# Altium PCB EVT_SYS_CARRIER.PcbDoc (part 2 of 2)
Units mil, origin at the board's own origin, x right, y up, seen from the top; angles counter-clockwise.
Board outline 3543.31 x 2755.91 mil, 4 copper layers (Top Layer, Mid-Layer 1, Mid-Layer 2, Bottom Layer), stack 63.036 mil thick; 105 components, 66 nets, 607 pads, 200 vias.
Unrouted connection lines stored in the file: 138.
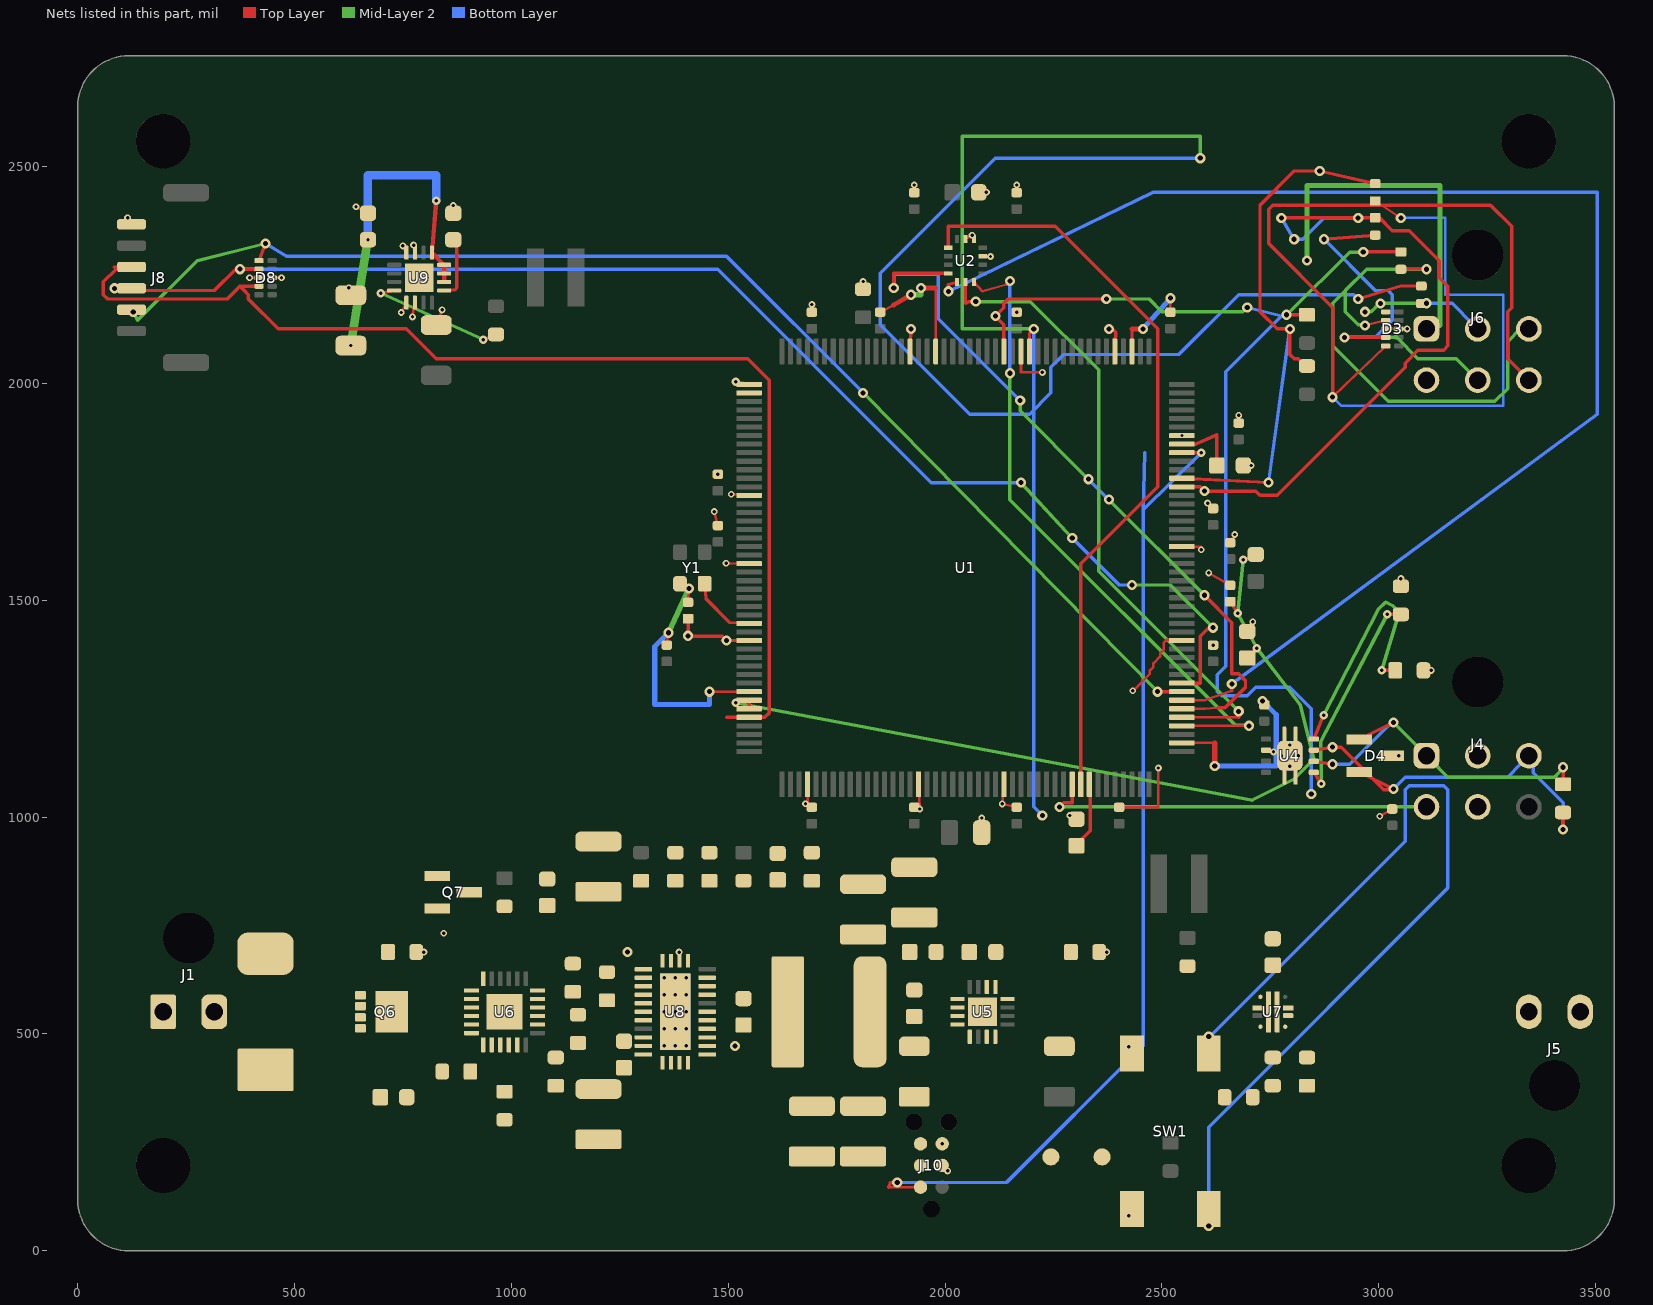
[diagram p4: the nets of this part, all layers, seen from the top]

## Via types
v1: diameter 23.62, hole 11.81, Top Layer to Bottom Layer, 90 vias
v2: diameter 15.75, hole 7.87, Top Layer to Bottom Layer, 89 vias
v3: diameter 19.68, hole 7.87, Top Layer to Bottom Layer, 18 vias
v4: diameter 15.75, hole 7.87, Top Layer to Mid-Layer 1, 2 vias
v5: diameter 11.81, hole 7.09, Top Layer to Mid-Layer 1, 1 vias

## Nets (pads, with @x,y where several pads share a name; then routed paths per layer and width w, separated by ;. In a path a pad name is that pad's centre, name@x,y a point inside that pad or via, vN(x,y) a via of type N, cw(c..) or ccw(c..) an arc to the next point about the centre after c; other vN are vias at no path point) (continued)
GND: C1.2 C2.2 C3.2 C4.2 C6D.2 C6I.2 C7D.2 C10.2 C11.2 C12.2 C13.2 C14.2 C15.2 C20.2 C21.2 C22.2 C40.2 C90.2 C91.2 C92.2 C93.2 C100.2 C101.2 C102.2 C103.2 C104.2 C105.2 C106.2 C107.2 C108.2 C109.2 C110.2 C111.2 C112.2 C113.2 C114.2 C115.2 C800.2 C801.2 C802.2 C803.2 C804.2 C806.2 C807.2 C808.2 C809.2 D1.2 D3.3 D3.8 D4.3 D8.3 D8.8 J1.2 J4.2 J4.5 J5.2 J6.1 J6.4 J8.6 J10.3 J10.5 R1.2 R2.2 R10.2 R41.2 R42.2 R63.2 R73.2 R801.2 R802.2 R805.2 SW1.2 U1.14 U1.22 U1.37 U1.48 U1.61 U1.71 U1.90 U1.102 U1.113 U1.126 U1.135 U1.148 U1.158 U2.6 U2.7 U2.9 U4.2 U4.9 U5.5 U5.6 U5.15 U5.16 U5.17 U6.8 U6.11 U6.25 U7.8 U8.13 U8.14 U8.15 U8.17 U8.19 U8.24 U8.25 U8.26 U8.27 U8.28 U8.29 U8.30 U8.31 U9.5 U9.6 U9.15 U9.16 U9.17 Y1.2 | length 4111
  Top Layer w5.91: v2(114.99,2382.37) J8.6@124.02,2367.13 ; v2(396.26,2244.09) D8.3@417.91,2244.09 ; D8.8@448.23,2244.09 v2(469.88,2244.09) ; v2(625.34,2220.85) C90.2@629.92,2203.74 ; v2(641.73,2407.48) C93.2@669.29,2392.72 ; v2(746.2,2163.75) U9.5@757.87,2186.52 ; v2(749.79,2317.44) U9.16@757.87,2301.67 ; v2(771.92,2153.53) U9.6@777.56,2186.52 ; v2(774.57,2319.14) U9.15@777.56,2301.67 ; R1.2@780.51,688.98 v2(798.23,688.98) ; U9.17@787.4,2244.09 v2(805.12,2244.09) ; C91.2@826.77,2134.84 v2(840.19,2169.76) ; C92.2@866.14,2392.72 v2(866.14,2410.43) ; C115.2@1407.48,1495.28 v1(1409.45,1527.56) ; v1(1456.69,1289.37) U1.37@1548.23,1289.37 ; v2(1467.72,1704.77) C101.2@1476.38,1672.44 ; v2(1495.09,1585.69) U1.22@1548.23,1584.65 ; v2(1506.97,1744.68) U1.14@1548.23,1742.13 ; U1.48@1683.07,1075.79 1683.07,1030.77 v2(1678.24,1030.77) C103.2@1692.91,1022.83 ; C15.2@1692.91,2164.57 v2(1692.91,2182.28) ; R10.2@1811.02,2217.52 v2(1811.02,2235.24) ; C113.2@1850.39,2164.57 1881.89,2181.1 ; C104.2@1929.13,1022.83 v2(1941.72,1018.77) U1.61@1938.98,1075.79 ; C20.2@1929.13,2440.16 v2(1929.13,2457.87) ; U1.158@1978.35,2073.82 1978.35,2220.47 ; J10.3@1993.5,196.85 v2(2006.03,184.32) ; U2.6@2047.24,2333.17 v2(2062.59,2342.03) U2.7@2066.93,2333.17 ; C21.2@2077.76,2440.94 v2(2095.47,2440.95) ; C12.2@2084.65,964.57 v2(2084.65,998.03) ; U2.9@2087.11,2293.31 v2(2104.82,2292.96) ; U1.71@2135.83,1075.79 v2(2131.93,1030.68) C105.2@2165.35,1022.83 ; C22.2@2165.35,2440.16 v2(2165.35,2457.87) ; U1.148@2175.2,2073.82 2175.2,2025.63 v4(2224.41,2025.63) ; v2(2287.81,1003.94) C10.2@2303.15,995.08 ; R2.2@2355.31,688.98 v2(2373.03,688.98) ; C106.2@2401.57,1022.83 2492.05,1022.84 v2(2492.05,1113.31) ; v2(2423.25,80.58) SW1.2@2431.1,96.46 ; v2(2423.25,470.6) SW1.2@2431.1,454.72 ; U1.135@2431.1,2073.82 2431.1,2125.98 ; v2(2433.07,1291.34) 2472.44,1330.71 2472.44,1338.58 2480.32,1346.46 2480.32,1354.33 2496.06,1370.08 2496.06,1377.95 2503.94,1385.83 2503.94,1401.57 2511.81,1409.45 2527.56,1409.45 U1.102@2546.26,1407.48 ; C111.2@2519.69,2164.57 v1(2519.68,2196.85) ; U1.90@2546.26,1171.26 2622.05,1171.26 ; U1.113@2546.26,1624.02 2590.93,1624.02 v2(2590.93,1616.65) ; v2(2605.58,1724.34) C109.2@2618.11,1711.81 ; v2(2608.04,1563.19) C13.2@2657.48,1534.65 ; C114.2@2657.48,1633.07 v2(2668.31,1651.82) ; C110.2@2677.17,1908.66 v2(2677.16,1926.38) ; C11.2@2687.99,1811.02 v2(2705.71,1811.02) ; C14.2@2696.85,1428.15 v2(2709.65,1450.31) ; U4.2@2740.16,1154.53 v2(2757.41,1150.52) ; v2(3002.51,1002.17) C40.2@3031.5,1018.9 ; D3.3@3016.34,2125.98 v2(3065.55,2125.98) D3.8@3046.65,2125.98 ; D4.3@3029.04,1141.73 v2(3046.75,1141.73) ; R42.2@3051.18,1532.48 v2(3051.18,1550.2) ; R41.2@3103.35,1338.58 v2(3121.06,1338.58) ; C102.2@1358.27,1396.85 v1(1362.2,1425.2) C102.2@1358.27,1396.85
  Top Layer w11.81: 1881.89,2181.1 v1(1921.26,2204.72) ; v1(1944.88,2220.47) 1978.35,2220.47 ; 2431.1,2125.98 v1(2456.69,2125.98) ; v1(2622.05,1118.11) 2622.05,1171.26
  Mid-Layer 2 w11.81: v1(1362.2,1425.2) v1(1409.45,1527.56) ; v1(1921.26,2204.72) 1944.88,2204.72 v1(1944.88,2220.47) ; v1(2834.65,2283.46) 2834.65,2456.69 3141.73,2456.69 3141.73,2133.86
  Bottom Layer w11.81: v1(1362.2,1425.2) 1330.71,1393.7 1330.71,1259.84 1456.69,1259.84 v1(1456.69,1289.37) ; v1(2456.69,2125.98) v1(2519.68,2196.85) ; v1(2622.05,1118.11) 2763.78,1118.11 2763.78,1236.22 v1(2732.28,1267.72)
  other v1: 1515.75,472.44 1267.72,688.98
  other v2: 1993.5,246.85 1386.81,688.98 843.98,732.28 2618.11,1396.85 1476.38,1790.55
  other v4: 2165.35,2164.57
  other v5: 2546.26,1879.92
GNSS_PPS: D8.4 J8.4 U1.40 | length 2730.4
  Top Layer w7.87: J8.4@124.02,2268.7 84.65,2268.7 88.58,2263.78 59.06,2234.25 59.06,2204.72 68.9,2194.88 344.49,2194.88 364.17,2214.57 374.02,2224.41 ; D8.4@417.91,2224.41 374.02,2224.41 ; U1.40@1548.23,1230.31 1496.06,1230.32 1505.91,1230.32 1584.65,1230.32 1594.49,1240.16 1594.49,2007.87 1545.28,2057.09 826.77,2057.09 757.87,2125.98 462.6,2125.98 393.7,2194.88 393.7,2204.72 383.86,2214.57 374.02,2224.41
GNSS_RX_EXT: D8.1 J8.2 U1.96 | length 2967.8
  Top Layer w7.87: J8.2@124.02,2170.28 v1(127.95,2165.35) ; D8.1@417.91,2283.46 v1(433.07,2322.83) ; v1(2490.16,1289.37) U1.96@2546.26,1289.37
  Mid-Layer 2 w7.87: v1(127.95,2165.35) 137.8,2145.67 275.59,2283.46 v1(433.07,2322.83) ; v1(1811.02,1978.35) v1(2490.16,1289.37)
  Bottom Layer w7.87: v1(433.07,2322.83) 482.28,2293.31 1496.06,2293.31 v1(1811.02,1978.35)
GNSS_TX_EXT: D8.2 J8.3 U1.97 | length 3171.7
  Top Layer w7.87: J8.3@124.02,2219.49 v1(84.65,2219.49) 98.43,2214.57 314.96,2214.57 364.17,2263.78 v1(374.02,2263.78) D8.2@417.91,2263.78 ; U1.97@2546.26,1309.06 2588.58,1309.06 2588.58,1417.32 2608.27,1437.01 v1(2618.11,1437.01)
  Mid-Layer 2 w7.87: v1(2175.2,1771.65) v1(2293.31,1643.7) ; v1(2431.1,1535.43) 2519.68,1535.43 2608.27,1446.85 v1(2618.11,1437.01)
  Bottom Layer w7.87: v1(374.02,2263.78) 383.86,2263.78 1476.38,2263.78 1968.5,1771.65 2165.35,1771.65 v1(2175.2,1771.65) ; v1(2293.31,1643.7) 2401.57,1535.43 v1(2431.1,1535.43)
HOST_UART1_RX: R600.2 R602.2 TP2.1 U1.150 | length 2558.4
  Top Layer w7.87: U1.150@2135.83,2073.82 2135.83,2086.61 2135.83,2135.83 v1(2116.14,2155.51) 2135.83,2175.2 2135.83,2185.04 2145.67,2194.88 v1(2372.05,2194.88) ; v1(2787.4,2158.46) R600.2@2834.65,2158.46 ; v1(2964.57,2303.54) R602.2@3051.18,2303.54
  Mid-Layer 2 w7.87: v1(2372.05,2194.88) 2470.47,2194.88 2500,2165.35 2687.01,2165.35 v1(2696.85,2175.2) ; v1(2787.4,2158.46) 2795.28,2165.35 2933.07,2303.15 2952.76,2303.15 v1(2964.57,2303.54)
  Bottom Layer w7.87: v1(2696.85,2175.2) 2775.59,2155.51 ; v1(2844.49,1053.15) 2844.49,1062.99 2844.49,1250 2795.28,1299.21 2716.54,1299.21 2696.85,1279.53 2637.8,1279.53 2627.95,1289.37 2627.95,1328.74 2647.64,1348.43 2647.64,2027.56 2775.59,2155.51 ; 2775.59,2155.51 v1(2787.4,2158.46) 2775.59,2155.51
HOST_UART1_RX_EXT: D3.2 J6.3 R602.1 | length 1403.1
  Top Layer w5.91: v1(2968.5,2133.86) D3.2@3016.34,2145.67 ; R602.1@3051.18,2263.39 v1(3110.24,2263.39)
  Mid-Layer 2 w7.87: v1(2968.5,2133.86) 2962.6,2135.83 2952.76,2135.83 2923.23,2165.35 2923.23,2214.57 2972.44,2263.78 ; J6.3@3336.61,2135.83 3326.77,2125.98 3297.24,2096.46 3297.24,1988.19 3267.72,1958.66 3021.65,1958.66 2893.7,2086.61 2893.7,2185.04 2972.44,2263.78 ; 2972.44,2263.78 v1@3100.39,2263.78 ; 2972.44,2263.78 v1@3100.39,2263.78 ; v1@3100.39,2263.78 v1(3110.24,2263.39) v1@3100.39,2263.78
HOST_UART1_TX: R601.2 TP1.1 U1.147 | length 4852.8
  Top Layer w7.87: U1.147@2194.88,2073.82 2194.88,2116.14 v1(2204.72,2125.98) ; v1(2952.76,2194.88) 3051.18,2224.8 R601.2@3098.43,2224.8
  Mid-Layer 2 w7.87: v1(2204.72,2125.98) 2039.37,2125.98 2039.37,2570.08 2588.58,2570.08 v1(2588.58,2519.68)
  Bottom Layer w7.87: v1(2204.72,2125.98) 2204.72,2116.14 2204.72,1023.62 2214.57,1013.78 v1(2224.41,1003.94) ; v1(2588.58,2519.68) 2116.14,2519.68 1850.39,2253.94 1850.39,2135.83 2057.09,1929.13 2194.88,1929.13 2244.09,1978.35 2244.09,2037.4 2273.62,2066.93 2539.37,2066.93 2677.17,2204.72 2942.91,2204.72 v1(2952.76,2194.88)
HOST_UART1_TX_EXT: D3.1 J6.2 R601.1 | length 289.6
  Top Layer w7.87: R601.1@3098.43,2184.65 v1(3110.24,2185.04)
  Mid-Layer 2 w7.87: v1(2968.5,2165.35) 2982.28,2165.35 2992.13,2175.2 v1(3003.94,2184.65) 3011.81,2185.04 v1(3110.24,2185.04)
  Bottom Layer w7.87: v1(3110.24,2185.04) 3169.29,2185.04 J6.2@3218.5,2135.83
HOST_UART2_RX: R604.2 R605.2 U1.121 | length 1299.4
  Top Layer w7.87: U1.121@2546.26,1781.5 v1(2746.06,1771.65) ; R605.2@2834.65,2040.35 2824.8,2047.24 2814.96,2057.09 2805.12,2057.09 2795.28,2066.93 2795.28,2116.14 v1(2795.28,2125.98) 2785.43,2125.98 2765.75,2125.98 2726.38,2165.35 2726.38,2411.42 2805.12,2490.16 2854.33,2490.16 v1(2864.17,2490.16) R604.2@2992.13,2461.02
  Bottom Layer w7.87: v1(2746.06,1771.65) v1(2795.28,2125.98)
HOST_UART2_RX_EXT: D3.5 J6.6 R604.1 | length 2770.7
  Top Layer w5.91: v1(2893.7,1968.5) D3.5@3016.34,2086.61 ; R604.1@2992.13,2420.87 v1(3051.18,2381.89)
  Top Layer w7.87: v1(2893.7,1968.5) 2893.7,1978.35 2893.7,2175.2 2746.06,2322.83 2746.06,2401.57 2755.91,2411.42 3257.87,2411.42 3307.09,2362.2 3307.09,2175.2 3297.24,2165.35 3297.24,2057.09 3336.61,2017.72 J6.6@3346.46,2007.87
  Bottom Layer w5.91: v1(2893.7,1968.5) 2913.39,1948.82 3153.54,1948.82 3287.4,1948.82 3287.4,2204.72 3153.54,2204.72 3153.54,2381.89 v1(3051.18,2381.89)
HOST_UART2_TX: R603.2 U1.120 | length 1644.5
  Top Layer w7.87: U1.120@2546.26,1761.81 2588.58,1761.81 v1(2598.43,1751.97) 2608.27,1751.97 2716.54,1751.97 2726.38,1742.13 2765.75,1742.13 3061.02,2037.4 3061.02,2047.24 3090.55,2076.77 3149.61,2076.77 3159.45,2086.61 3159.45,2224.41 3139.76,2244.09 3139.76,2283.46 3070.87,2352.36 3031.5,2352.36 3001.97,2381.89 2785.43,2381.89 v1(2775.59,2381.89) ; v1(2952.76,2381.89) R603.2@2992.13,2382.28
  Bottom Layer w7.87: v1(2775.59,2381.89) v1(2805.12,2332.68) 2814.96,2332.68 2824.8,2332.68 2874.02,2381.89 2942.91,2381.89 v1(2952.76,2381.89)
HOST_UART2_TX_EXT: D3.4 J6.5 R603.1 | length 943.6
  Top Layer w7.87: v1(2874.02,2332.68) R603.1@2992.13,2342.13 ; v1(2921.26,2106.3) D3.4@3016.34,2106.3
  Mid-Layer 2 w7.87: v1(2921.26,2106.3) 2933.07,2106.3 3041.34,2106.3 3090.55,2057.09 3179.13,2057.09 3208.66,2027.56 J6.5@3218.5,2017.72
  Bottom Layer w7.87: v1(2874.02,2332.68) 2992.13,2214.57 3021.65,2214.57 3031.5,2204.72 3031.5,2145.67 2992.13,2106.3 2933.07,2106.3 v1(2921.26,2106.3)
IMU_DRDY: U1.80 U2.4 | length 1752.9
  Top Layer w7.87: U2.4@2007.87,2312.99 2007.87,2362.2 2253.94,2362.2 2490.16,2125.98 2490.16,1761.81 2312.99,1584.65 U1.80@2312.99,1075.79
IMU_MISO: U1.94 U2.1 | length 1714.6
  Top Layer w5.91: U1.94@2546.26,1250 2598.43,1250 2629.92,1251.97
  Top Layer w7.87: v1(1881.89,2220.47) 1881.89,2253.94 U2.1@2007.38,2253.94 ; v1(2598.43,1511.81) 2661.42,1448.82 2661.42,1330.71 2677.17,1330.71 2692.91,1314.96 2692.91,1299.21 2645.67,1251.97 2629.92,1251.97
  Mid-Layer 2 w7.87: v1(2173.23,1960.63) 2173.23,1937.01 v1(2330.71,1779.53) ; v1(2377.95,1732.28) v1(2598.43,1511.81)
  Bottom Layer w7.87: v1(1881.89,2220.47) 1881.89,2251.97 1984.25,2251.97 1984.25,2181.1 1984.25,2149.61 v1(2173.23,1960.63) ; v1(2330.71,1779.53) v1(2377.95,1732.28)
IMU_MOSI: U1.95 U2.14 | length 3278.1
  Top Layer w5.91: U1.95@2546.26,1269.68 2598.43,1269.68 2661.42,1291.34
  Top Layer w7.87: v1(2007.87,2212.6) 2007.87,2228.35 U2.14@2027.56,2233.76 ; 2661.42,1291.34 v1(2661.42,1307.09)
  Bottom Layer w7.87: v1(2007.87,2212.6) 2480.32,2440.94 3307.09,2440.94 3503.94,2440.94 3503.94,1929.13 v1(2661.42,1307.09)
IMU_NSS: U1.92 U2.12 | length 1522.3
  Top Layer w5.91: U2.12@2066.93,2233.76 2086.61,2212.6 v1@2141.73,2228.35 ; U1.92@2546.26,1210.63 2598.43,1210.63 v1(2700.79,1210.63)
  Top Layer w7.87: v1@2141.73,2228.35 v1(2149.61,2236.22)
  Mid-Layer 2 w7.87: v1(2149.61,2023.62) 2149.61,1732.28 2669.29,1212.6 v1@2700.79,1212.6
  Bottom Layer w7.87: v1(2149.61,2023.62) v1(2149.61,2236.22)
IMU_SCK: U1.93 U2.13 | length 1487.8
  Top Layer w5.91: U1.93@2546.26,1230.31 2598.43,1230.32 2677.17,1230.32
  Top Layer w7.87: U2.13@2047.24,2233.76 2047.24,2185.04 2055.12,2188.98 v1(2070.87,2188.98) ; 2677.17,1230.32 v1(2677.17,1244.09)
  Mid-Layer 2 w7.87: v1(2070.87,2188.98) 2196.85,2188.98 2354.33,2031.5 2354.33,1566.93 v1(2677.17,1244.09)
MCU_HSE_25M: U1.29 Y1.3 | length 156.9
  Top Layer w7.87: Y1.3@1445.87,1538.39 1448.82,1503.94 1503.94,1448.82 U1.29@1548.23,1446.85
NRST: C115.1 SW1.1 U1.31 | length 2302
  Top Layer w7.87: C115.1@1407.48,1457.48 v1(1407.48,1418.11) 1417.32,1417.32 1486.22,1417.32 v1(1496.06,1407.48) ; v1@1486.22,1407.48 v1(1496.06,1407.48) ; U1.31@1548.23,1407.48 v1(1496.06,1407.48)
  Mid-Layer 2 w7.87: v1@2598.43,492.13 v1(2608.27,494.09)
  Bottom Layer w7.87: v1(2608.27,57.09) 2608.27,68.9 2608.27,285.43 3159.45,836.61 3159.45,1062.99 3149.61,1072.83 3070.87,1072.83 3061.02,1062.99 3061.02,944.88 2618.11,501.97 v1(2608.27,494.09)
RADAR_12V: J5.1 U7.6
RADAR_CANH: D4.1 J4.3 R40.1 U4.7 | length 899.8
  Top Layer w7.87: U4.7@2850.39,1154.53 v1(2893.7,1161.42) 2903.54,1161.42 2913.39,1161.42 3011.81,1062.99 3021.65,1062.99 v1(3033.96,1064.96) D4.1@2955.22,1104.33 ; v1(3425.2,971.46) R40.1@3425.2,1010.83
  Mid-Layer 2 w7.87: J4.3@3336.61,1131.89 J4.3@3346.46,1141.73
  Bottom Layer w7.87: v1(3033.96,1064.96) 3041.34,1072.83 3061.02,1092.52 3297.24,1092.52 3326.77,1122.05 J4.3@3336.61,1131.89 ; J4.3@3346.46,1141.73 3356.3,1131.89 3356.3,1122.05 3356.3,1102.36 3425.2,1033.46 3425.2,984.25 v1(3425.2,971.46)
RADAR_CANL: D4.2 J4.1 R40.2 U4.6 | length 804.5
  Top Layer w7.87: U4.6@2850.39,1128.94 v1(2893.7,1122.05) ; D4.2@2955.22,1179.13 v1(3033.96,1218.5) ; R40.2@3425.2,1075.79 v1(3425.2,1115.16)
  Mid-Layer 2 w7.87: v1(3033.96,1218.5) 3041.34,1210.63 3100.39,1151.57 J4.1@3110.24,1141.73 3120.08,1131.89 3159.45,1092.52 3405.51,1092.52 3415.35,1102.36 v1(3425.2,1115.16)
  Bottom Layer w7.87: v1(2893.7,1122.05) 2903.54,1122.05 2933.07,1122.05 3021.65,1210.63 v1(3033.96,1218.5)
RADAR_EFUSE_FLT: R7F.1 U1.2 U7.4
RADAR_REF: J4.4 U1.79 | length 922.4
  Top Layer w7.87: v1(2263.78,1023.62) 2273.62,1033.46 2293.31,1033.46 U1.79@2293.31,1075.79
  Mid-Layer 2 w7.87: v1(2263.78,1023.62) 3090.55,1023.62 3100.39,1023.62 J4.4@3100.39,1013.78
SHDN_PD: R42.1 U4.5 | length 491
  Top Layer w7.87: U4.5@2850.39,1103.35 v3(2867.87,1077.17) ; v3(3019.68,1467.52) R42.1@3051.18,1467.52
  Mid-Layer 2 w7.87: v3(2867.87,1077.17) 2866.14,1173.23 v3(3019.68,1467.52)
STB_PD: R41.1 U4.8 | length 569
  Top Layer w7.87: U4.8@2850.39,1180.12 v3(2872.99,1234.68) ; v3(3006.89,1338.58) R41.1@3038.39,1338.58
  Mid-Layer 2 w7.87: v3(2872.99,1234.68) 3000,1480.32 3015.75,1496.06 3031.5,1488.19 3047.24,1472.44 v3(3006.89,1338.58)
SWCLK: J10.4 U1.137 | length 63.3
  Top Layer w7.87: v1(2377.95,2125.98) 2385.83,2125.98 2393.7,2118.11 U1.137@2391.73,2073.82
SWDIO: J10.2 U1.124 | length 2530.2
  Top Layer w5.91: 1870.08,146.85 J10.2@1943.5,146.85
  Top Layer w7.87: 1870.08,146.85 1874.02,157.48 v1(1889.76,157.48) ; U1.124@2546.26,1840.55 v3(2590.55,1840.55)
  Bottom Layer w7.87: v1(1889.76,157.48) 2141.73,157.48 2456.69,472.44 2456.69,1708.66 ; v3(2590.55,1840.55) 2456.69,1708.66 ; 2456.69,1708.66 2460.63,1840.55 2456.69,1708.66
SWO: J10.6 U1.161 | length 52.2
  Top Layer w7.87: U1.161@1919.29,2073.82 1921.26,2118.11 v1(1921.26,2125.98)
SYS_EFUSE_FLT: R6F.1 U1.1 U6.14 | length 31.5
  Top Layer w7.87: v3(1517.32,2004.17) U1.1@1548.23,1998.03
U5_PG: R5P.1 U5.4
U5_SS_LOCAL: C3.1 U5.9
U6_BGATE: Q6.4 Q7.3 U6.3
U6_DRV: Q7.1 U6.4
U6_DVDT: C6D.1 U6.9
U6_ILIM_LOCAL: R1.1 U6.10
U6_IN_BLOCKED: Q6.5 U6.1 U6.2
U6_OVP_LOCAL: R62.2 R63.1 U6.7
U6_PGTH_LOCAL: R804.2 R805.1 U6.15
U6_UVLO_LOCAL: R61.2 R62.1 U6.6
U7_DVDT: C7D.1 U7.7
U7_ILIM_LOCAL: R2.1 U7.9
U7_OVLO_LOCAL: R72.2 R73.1 U7.2
U7_UVLO_LOCAL: R71.2 R72.1 U7.1
U8_BOOT: C805.1 U8.6
U8_ENABLE: R806.1 U6.16 U8.18
U8_FB_LOCAL: R800.2 R801.1 U8.12
U8_PGOOD: R803.1 U8.16
U8_RT_LOCAL: R802.1 U8.10
U8_SW: C805.2 L8.1 U8.1 U8.2 U8.3 U8.4 U8.5
U8_VCC: C803.1 U8.8
U9_PG: R90.1 U9.4 | length 322.7
  Top Layer w7.87: v3(698.94,2208.43) U9.4@729.82,2214.57 ; v3(935.47,2101.14) R90.1@964.57,2113.19
  Mid-Layer 2 w7.87: v3(698.94,2208.43) v3(935.47,2101.14)
U9_SS_LOCAL: C92.1 U9.9 | length 144.2
  Top Layer w7.87: U9.9@844.98,2214.57 870.08,2216.54 874.02,2220.47 874.02,2318.9 C92.1@866.14,2331.69
V12_SYS: C1.1 C4.1 C90.1 C93.1 C804.1 C806.1 C807.1 C808.1 C809.1 L8.2 R71.1 R800.1 U5.10 U5.11 U5.12 U5.13 U7.5 U8.9 U9.10 U9.11 U9.12 U9.13 | length 811.4
  Top Layer w9.84: v3(826.77,2421.26) U9.13@816.93,2301.67 U9.12@844.98,2273.62 U9.10@844.98,2234.25
  Mid-Layer 2 w19.68: v3(629.92,2087.6) v3(669.29,2331.69)
  Bottom Layer w19.68: v3(669.29,2331.69) 669.29,2480.32 826.77,2480.32 v3(826.77,2421.26)
VCAP1_LOCAL: C10.1 U1.81 | length 155.2
  Top Layer w7.87: C10.1@2303.15,934.06 2303.15,937.01 2334.65,968.5 2334.65,1070.87 U1.81@2332.68,1075.79
VCAP2_LOCAL: C11.1 U1.125 | length 156.2
  Top Layer w7.87: U1.125@2546.26,1860.24 2578.74,1860.24 2626.97,1881.89 C11.1@2626.97,1811.02
VDDA_FILTERED: C13.1 C14.1 FB1.2 U1.38 U1.39 | length 2040
  Top Layer w7.87: v3(1517.32,1263.54) U1.38@1548.23,1269.68 U1.39@1548.23,1250 ; C13.1@2657.48,1496.85 v3(2674.96,1470.67) ; v3(2687.44,1593.74) FB1.2@2716.54,1605.81 ; C14.1@2696.85,1367.13 v3(2719.13,1389.41)
  Mid-Layer 2 w7.87: v3(1517.32,1263.54) 2708.66,1039.37 2803.15,1086.61 2818.9,1102.36 2850.39,1133.86 2818.9,1259.84 v3(2719.13,1389.41) v3(2674.96,1470.67) v3(2687.44,1593.74)
VIN_PROTECTED_24V: C800.1 C801.1 C802.1 R804.1 R806.2 U6.17 U6.18 U6.24 U8.20 U8.21 U8.22
VIN_RAW: C6I.1 D1.1 J1.1 Q6.1 Q6.2 Q6.3 Q7.2 R61.1 U6.5
pads on no net: D3.6 D3.7 D3.9 D3.10 D8.5 D8.6 D8.7 D8.9 D8.10 J1.Un1 J4.6 J4.Un1 J5. J6.Un1 J8.5 J8.MP J10.Un1 J10.Un2 J10.Un3 Q6.Un1 Q6.Un2 Q6.Un3 Q6.Un4 Q6.Un5 Q6.Un6 Q6.Un7 Q6.Un8 U1.3 U1.4 U1.5 U1.7 U1.8 U1.9 U1.10 U1.11 U1.12 U1.13 U1.16 U1.17 U1.18 U1.19 U1.20 U1.21 U1.24 U1.25 U1.26 U1.27 U1.28 U1.30 U1.32 U1.33 U1.34 U1.35 U1.41 U1.42 U1.43 U1.44 U1.45 U1.46 U1.47 U1.50 U1.51 U1.52 U1.53 U1.54 U1.55 U1.56 U1.57 U1.58 U1.59 U1.60 U1.63 U1.64 U1.65 U1.66 U1.67 U1.68 U1.69 U1.70 U1.73 U1.74 U1.75 U1.76 U1.77 U1.78 U1.83 U1.84 U1.85 U1.86 U1.87 U1.88 U1.89 U1.98 U1.99 U1.100 U1.101 U1.104 U1.105 U1.106 U1.107 U1.108 U1.109 U1.110 U1.111 U1.112 U1.115 U1.116 U1.117 U1.118 U1.119 U1.122 U1.123 U1.128 U1.129 U1.130 U1.131 U1.132 U1.133 U1.134 U1.138 U1.139 U1.140 U1.141 U1.144 U1.145 U1.146 U1.151 U1.152 U1.153 U1.154 U1.155 U1.156 U1.157 U1.160 U1.162 U1.163 U1.164 U1.165 U1.167 U1.168 U1.169 U1.170 U1.173 U1.174 U1.175 U1.176 U2.2 U2.3 U2.10 U2.11 U4.Un1 U4.Un2 U4.Un3 U4.Un4 U4.Un5 U5.7 U5.8 U5.Un1 U5.Un2 U5.Un3 U5.Un4 U6.12 U6.13 U6.19 U6.20 U6.21 U6.22 U6.23 U6.Un1 U6.Un2 U6.Un3 U6.Un4 U7.3 U7.10 U7.Un1 U7.Un2 U7.Un3 U7.Un4 U8.7 U8.11 U8.23 U8.Un1 U8.Un2 U8.Un3 U8.Un4 U8.Un5 U8.Un6 U8.Un7 U8.Un8 U9.7 U9.8 U9.Un1 U9.Un2 U9.Un3 U9.Un4 Y1.1

## Polygon pours and split planes (outlines as drawn)
GND on Mid-Layer 1 "EVT_GND_L2_PLANE" (solid, pour order 1): 118.11,0 cw(c118.11,118.11) 0,118.11 0,2637.8 cw(c118.11,2637.8) 118.11,2755.91 3425.2,2755.91 cw(c3425.2,2637.8) 3543.31,2637.8 3543.31,118.11 cw(c3425.2,118.11) 3425.2,0
3V3 on Mid-Layer 2 "EVT_3V3_L3_PLANE" (solid, pour order 2): 118.11,0 cw(c118.11,118.11) 0,118.11 0,2637.8 cw(c118.11,2637.8) 118.11,2755.91 3425.2,2755.91 cw(c3425.2,2637.8) 3543.31,2637.8 3543.31,118.11 cw(c3425.2,118.11) 3425.2,0

## Other copper
Top Layer:
  rectangle net GND: 1342.52,568.9 1371.06,598.43
  rectangle net GND: 1342.52,503.94 1371.06,533.46
  rectangle net 3V3: 2549.21,720.47 2568.9,748.03
  rectangle net 3V3: 1328.74,311.02 1515.75,320.87
  region net U6_IN_BLOCKED: 1285.77,2217.71 1269.2,2217.71 1269.2,2212.19 1285.74,2212.19 1285.74,2192.51 1269.2,2192.51 1269.2,2186.21 1285.74,2186.21 1285.74,2166.52 1269.2,2166.52 1269.2,2161.01 1285.74,2161.01 1285.74,2141.13 1194.4,2141.13 1194.4,2237.59 1285.77,2237.59
  region net BUCK_SW: 2513.78,604.33 2507.87,604.33 2507.87,618.11 2494.09,618.11 2494.09,625.98 2513.78,625.98
  region net BUCK_SW: 2514.53,627.8 2515.17,627.38 2515.6,626.74 2515.75,625.98 2515.75,604.33 2515.6,603.58 2515.17,602.94 2514.53,602.51 2513.78,602.36 2507.87,602.36 2507.12,602.51 2506.48,602.94 2506.06,603.58 2505.91,604.33 2505.91,625.98 2506.06,626.74 2506.48,627.38 2507.12,627.8 2507.87,627.95 2513.78,627.95
  region net BUCK_SW: 2513.78,673.23 2494.09,673.23 2494.09,681.1 2507.87,681.1 2507.87,694.88 2513.78,694.88
  region net BUCK_SW: 2514.53,696.7 2515.17,696.27 2515.6,695.64 2515.75,694.88 2515.75,673.23 2515.6,672.48 2515.17,671.84 2514.53,671.41 2513.78,671.26 2507.87,671.26 2507.12,671.41 2506.48,671.84 2506.06,672.48 2505.91,673.23 2505.91,694.88 2506.06,695.64 2506.48,696.27 2507.12,696.7 2507.87,696.85 2513.78,696.85
Mid-Layer 1:
  rectangle net GND: 1307.09,545.28 1370.08,629.92
  rectangle net GND: 1503.94,472.44 1527.56,629.92
  rectangle net GND: 1255.91,629.92 1279.53,688.98
  rectangle net GND: 1169.29,472.44 1192.91,629.92
  rectangle net GND: 911.42,542.32 938.98,629.92
  rectangle net GND: 299.21,551.18 330.71,602.36
  rectangle net BUCK_SW: 2458.66,629.92 2498.03,728.35
  rectangle net GND: 923.23,600.39 2374.02,659.45
  rectangle net GND: 903.54,629.92 942.91,728.35
  rectangle net GND: 828.74,708.66 923.23,748.03
  rectangle net GND: 809.06,629.92 848.43,728.35
  rectangle net GND: 314.96,600.39 818.9,659.45
Mid-Layer 2:
  rectangle net 3V3: 2547.24,748.03 2570.87,952.76
  rectangle net 3V3: 1444.88,748.03 1468.5,952.76
  rectangle net 3V3: 972.44,748.03 996.06,952.76
  rectangle net 3V3: 1769.68,551.18 1828.74,952.76
  rectangle net 3V3: 984.25,923.23 3149.61,982.28

## Silkscreen, mask and mechanical layers (free items; w line width, h text height)
Top Overlay:
  drawing of 321 lines, arcs and shapes, not listed
Top Paste:
  region: 2570.87,681.1 2584.65,681.1 2584.65,673.23 2564.96,673.23 2564.96,694.88 2570.87,694.88
  region: 2571.62,696.7 2572.26,696.27 2572.68,695.64 2572.83,694.88 2572.83,673.23 2572.68,672.48 2572.26,671.84 2571.62,671.41 2570.87,671.26 2564.96,671.26 2564.21,671.41 2563.57,671.84 2563.14,672.48 2562.99,673.23 2562.99,694.88 2563.14,695.64 2563.57,696.27 2564.21,696.7 2564.96,696.85 2570.87,696.85
  region: 2584.65,618.11 2570.87,618.11 2570.87,604.33 2564.96,604.33 2564.96,625.98 2584.65,625.98
  region: 2571.62,627.8 2572.26,627.38 2572.68,626.74 2572.83,625.98 2572.83,604.33 2572.68,603.58 2572.26,602.94 2571.62,602.51 2570.87,602.36 2564.96,602.36 2564.21,602.51 2563.57,602.94 2563.14,603.58 2562.99,604.33 2562.99,625.98 2563.14,626.74 2563.57,627.38 2564.21,627.8 2564.96,627.95 2570.87,627.95
  region: 2513.78,604.33 2507.87,604.33 2507.87,618.11 2494.09,618.11 2494.09,625.98 2513.78,625.98
  region: 2514.53,627.8 2515.17,627.38 2515.6,626.74 2515.75,625.98 2515.75,604.33 2515.6,603.58 2515.17,602.94 2514.53,602.51 2513.78,602.36 2507.87,602.36 2507.12,602.51 2506.48,602.94 2506.06,603.58 2505.91,604.33 2505.91,625.98 2506.06,626.74 2506.48,627.38 2507.12,627.8 2507.87,627.95 2513.78,627.95
  region: 2513.78,673.23 2494.09,673.23 2494.09,681.1 2507.87,681.1 2507.87,694.88 2513.78,694.88
  region: 2514.53,696.7 2515.17,696.27 2515.6,695.64 2515.75,694.88 2515.75,673.23 2515.6,672.48 2515.17,671.84 2514.53,671.41 2513.78,671.26 2507.87,671.26 2507.12,671.41 2506.48,671.84 2506.06,672.48 2505.91,673.23 2505.91,694.88 2506.06,695.64 2506.48,696.27 2507.12,696.7 2507.87,696.85 2513.78,696.85
Top Solder:
  region: 1285.77,2217.71 1269.2,2217.71 1269.2,2212.19 1285.74,2212.19 1285.74,2192.51 1269.2,2192.51 1269.2,2186.21 1285.74,2186.21 1285.74,2166.52 1269.2,2166.52 1269.2,2161.01 1285.74,2161.01 1285.74,2141.13 1194.4,2141.13 1194.4,2237.59 1285.77,2237.59
  region: 2570.87,681.1 2584.65,681.1 2584.65,673.23 2564.96,673.23 2564.96,694.88 2570.87,694.88
  region: 2571.62,696.7 2572.26,696.27 2572.68,695.64 2572.83,694.88 2572.83,673.23 2572.68,672.48 2572.26,671.84 2571.62,671.41 2570.87,671.26 2564.96,671.26 2564.21,671.41 2563.57,671.84 2563.14,672.48 2562.99,673.23 2562.99,694.88 2563.14,695.64 2563.57,696.27 2564.21,696.7 2564.96,696.85 2570.87,696.85
  region: 2584.65,618.11 2570.87,618.11 2570.87,604.33 2564.96,604.33 2564.96,625.98 2584.65,625.98
  region: 2571.62,627.8 2572.26,627.38 2572.68,626.74 2572.83,625.98 2572.83,604.33 2572.68,603.58 2572.26,602.94 2571.62,602.51 2570.87,602.36 2564.96,602.36 2564.21,602.51 2563.57,602.94 2563.14,603.58 2562.99,604.33 2562.99,625.98 2563.14,626.74 2563.57,627.38 2564.21,627.8 2564.96,627.95 2570.87,627.95
  region: 2513.78,604.33 2507.87,604.33 2507.87,618.11 2494.09,618.11 2494.09,625.98 2513.78,625.98
  region: 2514.53,627.8 2515.17,627.38 2515.6,626.74 2515.75,625.98 2515.75,604.33 2515.6,603.58 2515.17,602.94 2514.53,602.51 2513.78,602.36 2507.87,602.36 2507.12,602.51 2506.48,602.94 2506.06,603.58 2505.91,604.33 2505.91,625.98 2506.06,626.74 2506.48,627.38 2507.12,627.8 2507.87,627.95 2513.78,627.95
  region: 2513.78,673.23 2494.09,673.23 2494.09,681.1 2507.87,681.1 2507.87,694.88 2513.78,694.88
  region: 2514.53,696.7 2515.17,696.27 2515.6,695.64 2515.75,694.88 2515.75,673.23 2515.6,672.48 2515.17,671.84 2514.53,671.41 2513.78,671.26 2507.87,671.26 2507.12,671.41 2506.48,671.84 2506.06,672.48 2505.91,673.23 2505.91,694.88 2506.06,695.64 2506.48,696.27 2507.12,696.7 2507.87,696.85 2513.78,696.85
Mechanical 1:
  lines w3.94: 0,2637.8 cw(c118.11,2637.8) 118.11,2755.91 ; 0,3031.5 cw(c118.11,3031.5) 118.11,3149.61 ; 3136.81,200 3477.36,200 3516.73,239.37 3516.73,589.76 3136.81,589.76 3136.81,239.37 ; 3425.2,0 ccw(c3425.2,118.11) 3543.31,118.11 ; 3425.2,2755.91 cw(c3425.2,2637.8) 3543.31,2637.8 ; 3818.9,0 ccw(c3818.9,118.11) 3937.01,118.11 ; 3818.9,3149.61 cw(c3818.9,3031.5) 3937.01,3031.5 ; 0,118.11 ccw(c118.11,118.11) 118.11,0 cw(c118.11,118.11) 0,118.11 ; 1023.62,2165.35 1181.1,2165.35 1181.1,2322.83 1023.62,2322.83 1023.62,2165.35 ; 1330.89,2145.66 1330.89,2259.83 1382.07,2259.83 1382.07,2145.66 1330.89,2145.66 ; 2401.57,157.48 2637.8,157.48 2637.8,393.7 2401.57,393.7 2401.57,157.48 ; 3045.28,1084.65 3045.28,1198.82 3096.46,1198.82 3096.46,1084.65 3045.28,1084.65
Mechanical 4:
  drawing of 518 lines, arcs and shapes, not listed
Mechanical 6:
  drawing of 408 lines, arcs and shapes, not listed
  text "'.Designator'" at 3714.64,2646.08 h39.37 r180
  text "'.Designator'" at 1623.02,2458.56 h31.5 r90
  text "'.Designator'" at 1740.1,2458.56 h31.5 r90
  text "'.Designator'" at 1857.19,2458.56 h31.5 r90
  text "'.Designator'" at 1974.28,2458.56 h31.5 r90
  text "'.Designator'" at 1374.4,2441.69 h39.37
  text "'.Designator'" at 1983.52,2427.71 h15.75
  text "'.Designator'" at 3069.02,2416.52 h39.37
  text "'.Designator'" at 1096.56,2407.75 h39.37
  text "'.Designator'" at 3000.77,2399.48 h10.24 r90
  text "'.Designator'" at 1937.5,2381.33 h9.84 r90
  text "'.Designator'" at 2173.72,2381.33 h9.84 r90
  text "'.Designator'" at 3000.77,2320.74 h10.24 r90
  text "'.Designator'" at 682.52,2298.48 h15.75 r90
  text "'.Designator'" at 879.38,2298.48 h15.75 r90
  text "'.Designator'" at 3059.82,2242 h10.24 r90
  text "'.Designator'" at 668.01,2219.38 h29.53
  text "'.Designator'" at 1442.26,2187.51 h31.5
  text "'.Designator'" at 3107.07,2163.26 h10.24 r90
  text "'.Designator'" at 1184.28,2162.12 h27.56
  text "'.Designator'" at 451.96,2155.78 h21.65 r90
  text "'.Designator'" at 1622.16,2154.57 h15.75 r90
  text "'.Designator'" at 1672.31,2154.57 h15.75 r90
  text "'.Designator'" at 1722.47,2154.57 h15.75 r90
  text "'.Designator'" at 1772.63,2154.57 h15.75 r90
  text "'.Designator'" at 1823.28,2154.57 h15.75 r90
  text "'.Designator'" at 1874.42,2154.57 h15.75 r90
  text "'.Designator'" at 1925.56,2154.57 h15.75 r90
  text "'.Designator'" at 1976.7,2154.57 h15.75 r90
  text "'.Designator'" at 2027.85,2154.57 h15.75 r90
  text "'.Designator'" at 1090.77,2124.94 h31.5 r90
  text "'.Designator'" at 1824.26,2121.31 h15.75 r90
  text "'.Designator'" at 1701.28,2105.74 h9.84 r90
  text "'.Designator'" at 1858.76,2105.74 h9.84 r90
  text "'.Designator'" at 2173.72,2105.74 h9.84 r90
  text "'.Designator'" at 2528.05,2105.74 h9.84 r90
  text "'.Designator'" at 229.93,2084.77 h39.37 r90
  text "'.Designator'" at 977.8,2081.94 h15.75 r90
  text "'.Designator'" at 1098.54,2076.76 h15.75
  text "'.Designator'" at 2847.88,2062.26 h15.75 r90
  text "'.Designator'" at 3050.38,2037.67 h21.65 r90
  text "'.Designator'" at 656.39,2018.21 h31.5 r90
  text "'.Designator'" at 853.24,2018.21 h31.5 r90
  text "'.Designator'" at 1050.56,2003.11 h15.75 r90
  text "'.Designator'" at 1101.7,2003.11 h15.75 r90
  text "'.Designator'" at 2847.88,1944.15 h15.75 r90
  text "'.Designator'" at 2685.53,1849.84 h9.84 r90
  text "'.Designator'" at 2593.75,1797.79 h15.75
  text "'.Designator'" at 1484.75,1731.72 h9.84 r90
  text "'.Designator'" at 2626.48,1652.98 h9.84 r90
  text "'.Designator'" at 1484.75,1613.61 h9.84 r90
  text "'.Designator'" at 2665.85,1574.24 h9.84 r90
  text "'.Designator'" at 1887.92,1541.72 h39.37
  text "'.Designator'" at 2729.77,1511.07 h15.75 r90
  text "'.Designator'" at 1433.86,1495.14 h19.68 r90
  text "'.Designator'" at 2665.85,1475.82 h9.84 r90
  text "'.Designator'" at 1415.85,1436.45 h9.84 r90
  text "'.Designator'" at 3064.41,1436.27 h15.75 r90
  text "'.Designator'" at 3069.02,1432.27 h39.37
  text "'.Designator'" at 1366.64,1338.02 h9.84 r90
  text "'.Designator'" at 2626.48,1338.02 h9.84 r90
  text "'.Designator'" at 2710.08,1333.91 h15.75 r90
  text "'.Designator'" at 3007.14,1325.35 h15.75
  text "'.Designator'" at 2744.59,1200.23 h9.84 r90
  text "'.Designator'" at 2683.95,1118.77 h27.56
  text "'.Designator'" at 3423.51,1046.63 h28.35 r90
  text "'.Designator'" at 3438.43,979.58 h15.75 r90
  text "'.Designator'" at 1701.28,964.01 h9.84 r90
  text "'.Designator'" at 1937.5,964.01 h9.84 r90
  text "'.Designator'" at 2173.72,964.01 h9.84 r90
  text "'.Designator'" at 2409.94,964.01 h9.84 r90
  text "'.Designator'" at 3039.87,960.07 h9.84 r90
  text "'.Designator'" at 1967.39,947.83 h19.68
  text "'.Designator'" at 2316.38,900.84 h15.75 r90
  text "'.Designator'" at 3781.37,890.56 h39.37 r180
  text "'.Designator'" at 96.58,841.72 h39.37
  text "'.Designator'" at 684.3,675.74 h15.75
  text "'.Designator'" at 1137.06,675.74 h15.75
  text "'.Designator'" at 1274.85,675.74 h15.75
  text "'.Designator'" at 2259.11,675.74 h15.75
  text "'.Designator'" at 879.38,625.25 h15.75 r90
  text "'.Designator'" at 997.49,625.25 h15.75 r90
  text "'.Designator'" at 1469.93,625.25 h15.75 r90
  text "'.Designator'" at 2454.18,625.25 h15.75 r90
  text "'.Designator'" at 2572.29,625.25 h15.75 r90
  text "'.Designator'" at 1457.98,575.9 h29.53 r180
  text "'.Designator'" at 790.04,525.59 h39.37
  text "'.Designator'" at 1494.22,518.1 h39.37
  text "'.Designator'" at 462.59,475.08 h39.37 r90
  text "'.Designator'" at 723.67,400.15 h15.75
  text "'.Designator'" at 2298.48,360.78 h15.75
  text "'.Designator'" at 879.38,349.66 h15.75 r90
  text "'.Designator'" at 958.12,349.66 h15.75 r90
  text "'.Designator'" at 2532.92,349.66 h15.75 r90
  text "'.Designator'" at 1207.57,285.93 h31.5 r90
  text "'.Designator'" at 1542.21,285.93 h31.5 r90
  text "'.Designator'" at 2454.18,270.92 h15.75 r90
  text "'.Designator'" at 3840.42,260.64 h39.37 r180
  text "'.Designator'" at 2788.99,254.06 h39.37 r90
  text "'.Designator'" at 2084.77,240.54 h39.37
  text "'.Designator'" at 2202.88,240.54 h39.37
  text "'.Designator'" at 2532.92,152.81 h15.75 r90
  text "'.Designator'" at 2001.59,37.53 h39.37 r90
Mechanical 7:
  text "KEEPOUT" at 1979.13,147.2 h15.75 r90
Mechanical 15:
  lines w1.97: 1013.39,2155.12 1191.34,2155.12 1191.34,2333.07 1013.39,2333.07 1013.39,2155.12 ; 1280.5,2135.82 1280.5,2269.67 1432.47,2269.67 1432.47,2135.82 1280.5,2135.82 ; 2391.73,45.28 2647.64,45.28 2647.64,505.91 2391.73,505.91 2391.73,45.28 ; 2994.88,1074.8 2994.88,1208.66 3146.85,1208.66 3146.85,1074.8 2994.88,1074.8 ; 3116.93,180.31 3116.93,609.84 3536.61,609.84 3536.61,180.31 3116.93,180.31